# Altium PCB PCB1.PcbDoc (part 3 of 4)
Units mm, origin at the board's own origin, x right, y up, seen from the top; angles counter-clockwise.
Board outline 159.38 x 83.25 mm, 8 copper layers (Top Layer 1, GND, Signal 1, Signal 2, Power, Signal 3, Signal 4, Bottom Layer), stack 1.998 mm thick; 345 components, 291 nets, 1244 pads, 614 vias.
Unrouted connection lines stored in the file: 12.
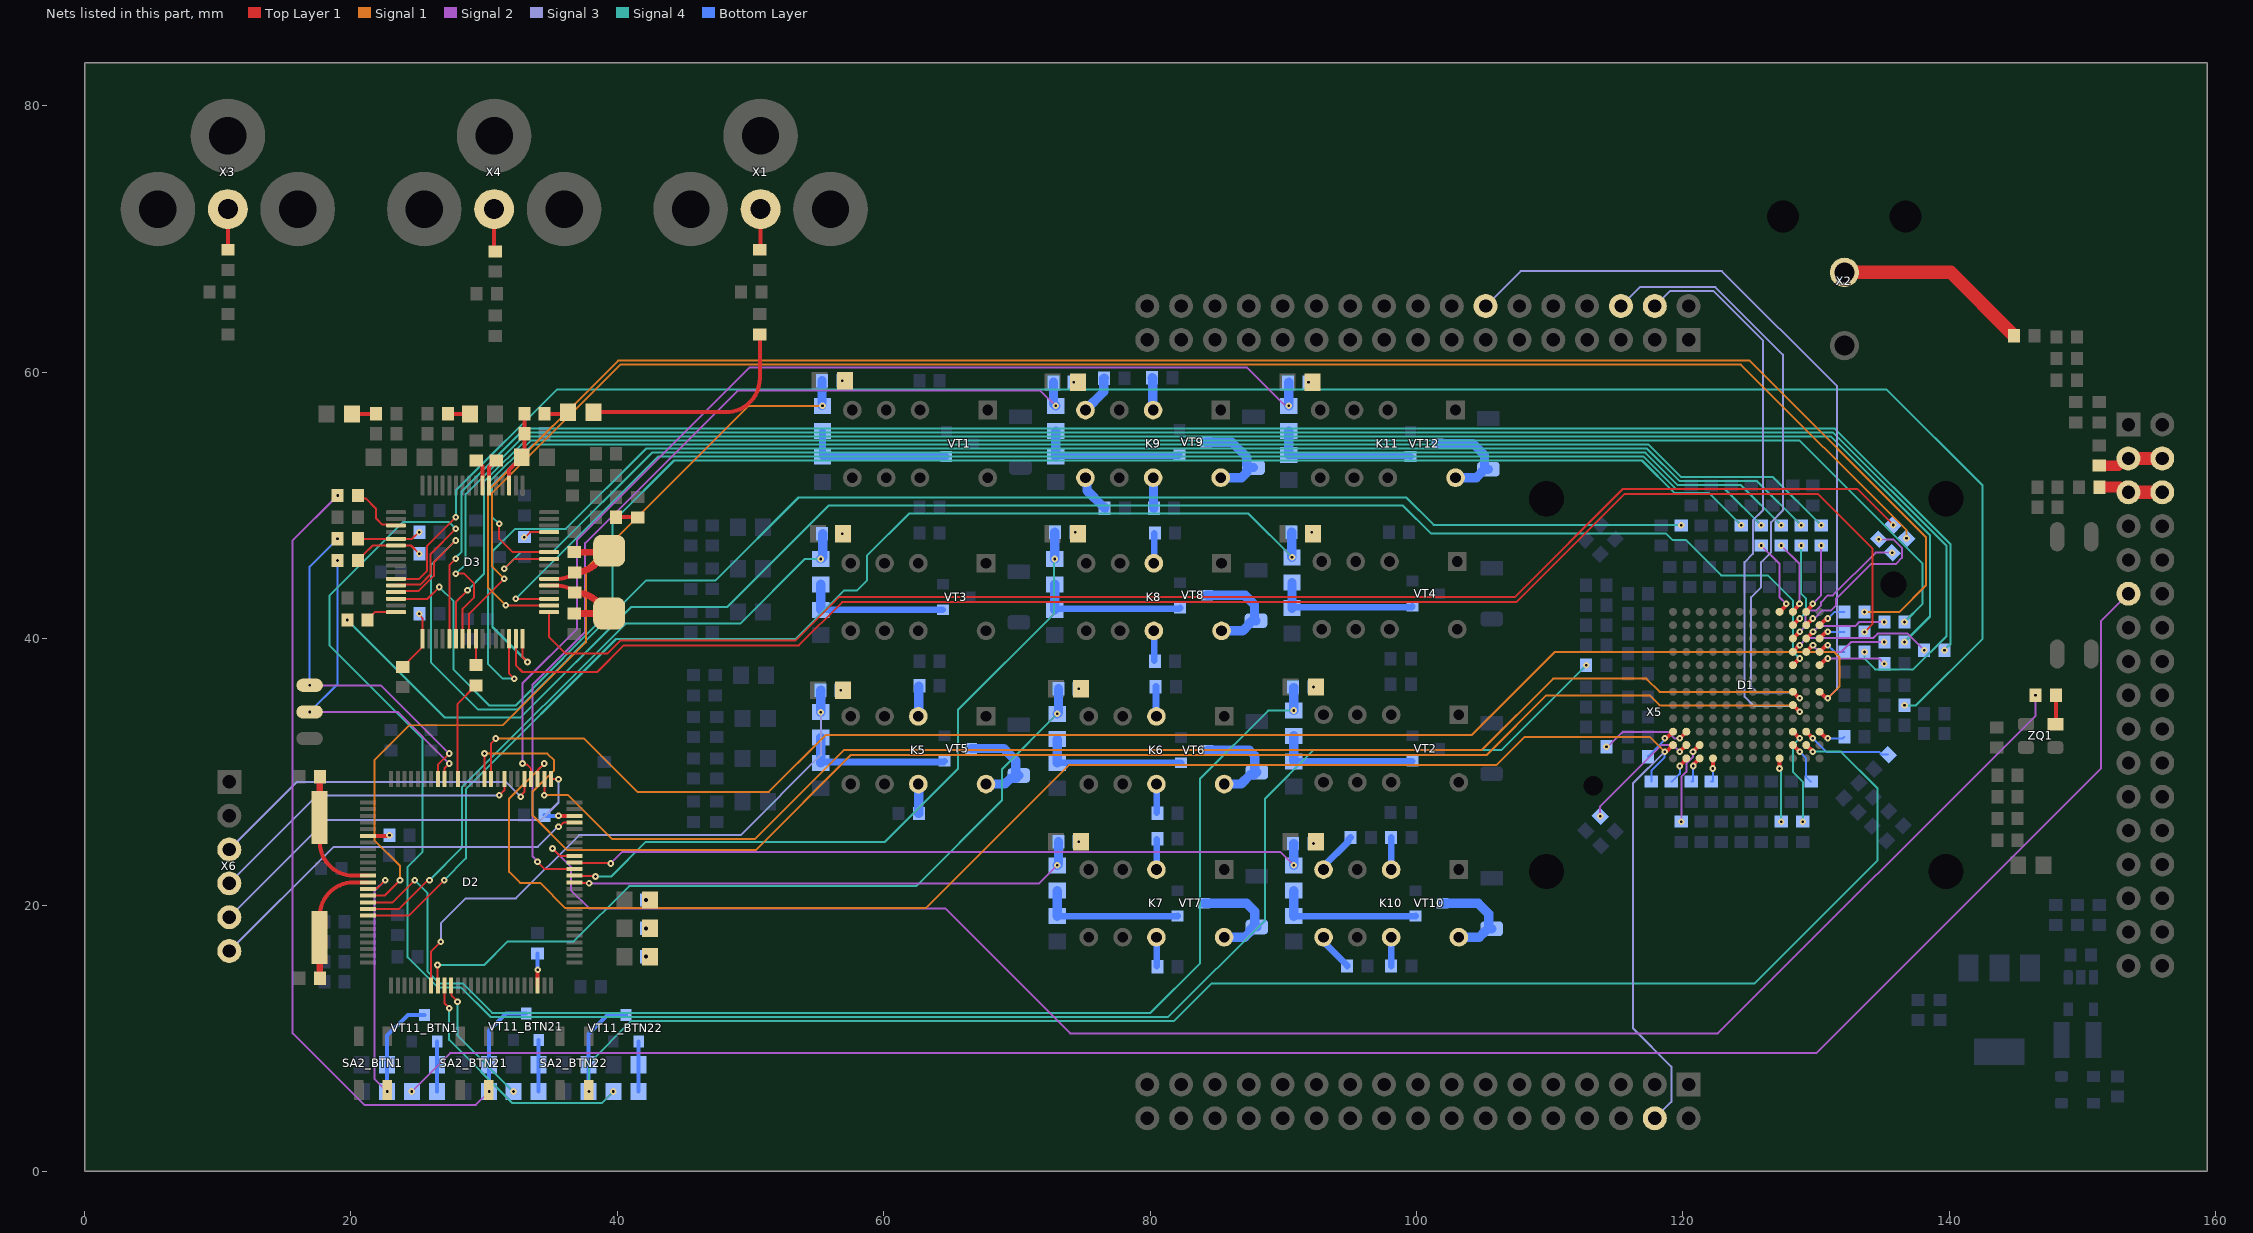
[diagram p9: the nets of this part, all layers, seen from the top]

## Via types
v1: diameter 0.5, hole 0.2, Top Layer 1 to Bottom Layer, tented both sides, 605 vias
v2: diameter 0.6, hole 0.3, Top Layer 1 to Bottom Layer, tented bottom, 6 vias
v3: diameter 0.6, hole 0.3, Top Layer 1 to Bottom Layer, tented both sides, 3 vias

## Nets (pads, with @x,y where several pads share a name; then routed paths per layer and width w, separated by ;. In a path a pad name is that pad's centre, name@x,y a point inside that pad or via, vN(x,y) a via of type N, cw(c..) or ccw(c..) an arc to the next point about the centre after c; other vN are vias at no path point) (continued)
NetK5_3: K5.3 R106.1 | length 2.3
  Top Layer 1 w0.7: K5.3@62.595,34.165 K5.3@62.63,34.2
  Bottom Layer w0.7: K5.3@62.63,34.2 R106.1@62.63,36.428
NetK5_10: K5.10 R113.1 | length 2.2
  Top Layer 1 w0.7: K5.10@62.595,29.085 K5.10@62.63,29.05
  Bottom Layer w0.7: R113.1@62.63,26.873 K5.10@62.63,29.05
NetK5_12: K5.12 VD19.1 VT5.3 | length 7.7
  Bottom Layer w0.7: VT5.3@66.566,31.752 68.998,31.752 69.92,30.83 69.92,29.925 70.12,29.725 VD19.1@70.138,29.725 69.938,29.525 69.525,29.525 69.085,29.085 K5.12@67.675,29.085
NetK6_3: K6.3 R108.1 | length 2.3
  Top Layer 1 w0.5: K6.3@80.443,34.192 K6.3@80.47,34.165
  Bottom Layer w0.5: R108.1@80.417,36.395 R108.1@80.443,36.422 ; K6.3@80.443,34.192 R108.1@80.443,36.369
NetK6_10: K6.10 R114.1 | length 2.2
  Top Layer 1 w0.5: K6.10@80.47,29.085 K6.10@80.506,29.049
  Bottom Layer w0.5: R114.1@80.506,26.931 K6.10@80.506,29.049
NetK6_12: K6.12 VD20.1 VT6.3 | length 7.8
  Bottom Layer w0.7: VT6.3@84.314,31.625 87.445,31.625 87.855,31.215 87.855,30.137 VD20.1@88.013,29.979 87.813,29.779 87.513,29.779 86.819,29.085 K6.12@85.55,29.085
NetK7_3: K7.3 R127.1 | length 2.3
  Top Layer 1 w0.5: K7.3@80.47,22.665 K7.3@80.507,22.702
  Bottom Layer w0.5: K7.3@80.507,22.702 R127.1@80.507,24.947
NetK7_10: K7.10 R134.1 | length 2.2
  Top Layer 1 w0.5: K7.10@80.47,17.585 K7.10@80.507,17.548
  Bottom Layer w0.5: R134.1@80.507,15.396 K7.10@80.507,17.548
NetK7_12: K7.12 VD28.1 VT7.3 | length 8.2
  Bottom Layer w0.7: VT7.3@84.06,20.125 87.25,20.125 87.856,19.519 87.856,18.509 VD28.1@88.013,18.352 87.713,18.352 87.513,18.152 87.513,17.995 87.103,17.585 K7.12@85.55,17.585
NetK8_3: K8.3 R128.1 | length 2.2
  Top Layer 1 w0.5: K8.3@80.279,45.663 K8.3@80.317,45.701
  Bottom Layer w0.5: K8.3@80.317,45.701 R128.1@80.317,47.895
NetK8_10: K8.10 R133.1 | length 2.3
  Top Layer 1 w0.5: K8.10@80.279,40.583 K8.10@80.317,40.545
  Bottom Layer w0.5: R133.1@80.317,38.346 K8.10@80.317,40.545
NetK8_12: K8.12 VD29.1 VT8.3 | length 8.1
  Bottom Layer w0.7: VT8.3@84.25,43.25 87.125,43.25 87.835,42.54 87.835,41.464 VD29.1@87.949,41.35 87.649,41.35 87.449,41.15 87.449,41.074 86.958,40.583 K8.12@85.359,40.583
NetK9_3: K9.3 R129.1 | length 2.4
  Bottom Layer w0.7: R129.1@80.145,59.578 80.182,59.541 80.182,57.203 K9.3@80.22,57.165
NetK9_5: K9.5 R132.1 | length 3
  Bottom Layer w0.7: K9.5@75.14,57.165 76.521,58.546 76.521,59.527 R132.1@76.548,59.554
NetK9_8: K9.8 R137.1 | length 2.9
  Bottom Layer w0.7: K9.8@75.14,52.085 75.259,51.966 75.259,51.129 76.439,49.949 76.489,49.949 76.589,49.849 R137.1@76.589,49.799
NetK9_10: K9.10 R135.1 | length 2.3
  Bottom Layer w0.7: K9.10@80.22,52.085 80.246,52.059 80.246,49.825 R135.1@80.272,49.799
NetK9_12: K9.12 VD30.1 VT9.3 | length 7.6
  Bottom Layer w0.7: VT9.3@84.191,54.752 86.123,54.752 87.263,53.612 87.263,53.052 VD30.1@87.463,52.852 ; K9.12@85.3,52.085 86.853,52.085 87.263,52.495 87.263,52.652 VD30.1@87.463,52.852 ; VD30.1@87.463,52.852 VD30.1@87.763,52.852 VD30.1@87.463,52.852
NetK10_3: K10.3 R130.1 | length 2.4
  Bottom Layer w0.5: K10.3@98.095,22.665 R130.1@98.095,25.072
NetK10_5: K10.5 R131.1 | length 3.2
  Bottom Layer w0.5: K10.5@93.015,22.665 93.015,22.909 94.847,24.741 94.847,24.872 R131.1@95.047,25.072
NetK10_8: K10.8 R138.1 | length 2.9
  Bottom Layer w0.5: K10.8@93.015,17.585 93.187,17.413 93.187,17.076 94.793,15.47 R138.1@94.793,15.42
NetK10_10: K10.10 R136.1 | length 2.2
  Bottom Layer w0.5: R136.1@98.095,15.42 K10.10@98.095,17.585
NetK10_12: K10.12 VD31.1 VT10.3 | length 7.7
  Bottom Layer w0.7: VT10.3@101.939,20.125 104.625,20.125 105.42,19.33 105.42,18.425 VD31.1@105.62,18.225 ; K10.12@103.175,17.585 104.71,17.585 105.138,18.013 105.138,18.025 105.338,18.225 VD31.1@105.638,18.225
NetK11_12: K11.12 VD21.1 VT12.3 | length 7.8
  Bottom Layer w0.7: VT12.3@101.562,54.625 104.25,54.625 105.107,53.768 105.107,52.925 VD21.1@105.307,52.725 ; K11.12@102.925,52.085 104.478,52.085 104.888,52.495 104.888,52.525 105.088,52.725 VD21.1@105.388,52.725
NetR49_1: R49.1 X1.1 | length 3.1
  Top Layer 1 w0.3: R49.1@50.694,69.2 50.75,69.256 X1.1@50.75,72.25
NetR51_1: R51.1 X3.1 | length 3.1
  Top Layer 1 w0.3: X3.1@10.75,72.25 10.75,69.21 R51.1@10.76,69.2
NetR53_1: R53.1 X4.1 | length 3.2
  Top Layer 1 w0.3: X4.1@30.75,72.25 30.75,69.149 R53.1@30.826,69.073
NetR56_2: R56.2 R57.1 | length 1.6
  Top Layer 1 w0.3: R56.2@39.905,49.125 41.495,49.125 cw(c41.495,49.091) R57.1@41.519,49.115
NetR91_2: R91.2 R92.1 | length 1.8
  Top Layer 1 w0.3: R92.1@34.53,56.875 36.175,56.875 R91.2@36.3,57
NetR95_2: R95.2 R96.1 | length 1.6
  Top Layer 1 w0.3: R96.1@27.28,56.875 R95.2@28.925,56.875
NetR99_2: R99.2 R100.1 | length 1.8
  Top Layer 1 w0.3: R99.2@20.075,56.875 R100.1@21.885,56.875
NetR115_1: R115.1 R121.2 VT1.1 | length 11.2
  Bottom Layer w0.5: R115.1@55.404,55.58 R121.2@55.404,53.67 55.406,53.673 64.688,53.673 VT1.1@64.691,53.675
NetR116_1: R116.1 R122.2 VT2.1 | length 10.8
  Bottom Layer w0.5: R122.2@90.779,30.795 90.781,30.798 99.682,30.798 VT2.1@99.685,30.8
  Bottom Layer w0.7: R122.2@90.779,30.795 R116.1@90.779,32.705
NetR117_1: R117.1 R123.2 VT3.1 | length 11.1
  Bottom Layer w0.5: R123.2@55.279,42.17 55.281,42.173 64.436,42.173 VT3.1@64.439,42.175
  Bottom Layer w0.7: R123.2@55.279,42.17 R117.1@55.279,44.08
NetR118_1: R118.1 R124.2 VT4.1 | length 11
  Bottom Layer w0.5: R124.2@90.654,42.295 90.72,42.361 99.621,42.361 VT4.1@99.687,42.427
  Bottom Layer w0.7: R124.2@90.654,42.295 R118.1@90.654,44.205
NetR119_1: R119.1 R125.2 VT5.1 | length 11.3
  Bottom Layer w0.5: R125.2@55.279,30.67 55.345,30.736 64.5,30.736 VT5.1@64.566,30.802
  Bottom Layer w0.7: R125.2@55.279,30.67 R119.1@55.279,32.58
NetR120_1: R120.1 R126.2 VT6.1 | length 11.1
  Bottom Layer w0.5: R126.2@73.027,30.67 73.03,30.673 82.311,30.673 VT6.1@82.314,30.675
  Bottom Layer w0.7: R126.2@73.027,30.67 R120.1@73.027,32.453
NetR139_1: R139.1 R143.2 VT7.1 | length 10.9
  Bottom Layer w0.5: R143.2@73.027,19.17 73.03,19.173 82.057,19.173 VT7.1@82.06,19.175
  Bottom Layer w0.7: R143.2@73.027,19.17 R139.1@73.027,21.08
NetR140_1: R140.1 R144.2 VT8.1 | length 11.4
  Bottom Layer w0.5: R144.2@72.836,42.168 72.902,42.234 82.184,42.234 VT8.1@82.25,42.3
  Bottom Layer w0.7: R144.2@72.836,42.168 R140.1@72.836,44.078
NetR141_1: R141.1 R145.2 VT9.1 | length 11.3
  Bottom Layer w0.5: R145.2@72.904,53.67 72.97,53.736 82.125,53.736 VT9.1@82.191,53.802
  Bottom Layer w0.7: R145.2@72.904,53.67 R141.1@72.904,55.58
NetR142_1: R142.1 R146.2 VT10.1 | length 11.1
  Bottom Layer w0.5: R146.2@90.779,19.17 90.781,19.173 99.936,19.173 VT10.1@99.939,19.175
  Bottom Layer w0.7: R146.2@90.779,19.17 R142.1@90.779,21.08
NetR148_BTN1_1: R148_BTN1.1 R149_BTN1.2 VT11_BTN1.1 | length 3.8
  Bottom Layer w0.3: R148_BTN1.1@26.47,6 VT11_BTN1.1@26.47,9.75
NetR148_BTN21_1: R148_BTN21.1 R149_BTN21.2 VT11_BTN21.1 | length 3.9
  Bottom Layer w0.3: R148_BTN21.1@34.095,6 R149_BTN21.2@34.095,8 VT11_BTN21.1@34.095,9.875
NetR148_BTN22_1: R148_BTN22.1 R149_BTN22.2 VT11_BTN22.1 | length 3.8
  Bottom Layer w0.3: R148_BTN22.1@41.595,6 R149_BTN22.2@41.595,8 VT11_BTN22.1@41.595,9.75
NetR150_1: R150.1 R151.2 VT12.1 | length 11
  Bottom Layer w0.5: R151.2@90.402,53.797 90.463,53.736 99.501,53.736 VT12.1@99.562,53.675
  Bottom Layer w0.7: R151.2@90.402,53.797 R150.1@90.402,55.58
NetR155_2: R155.2 VD1.1
  other v1: 56.885,59.375
NetR156_2: R156.2 VD2.1
  other v1: 92.26,36.375
NetR157_2: R157.2 VD3.1
  other v1: 56.885,47.875
NetR158_2: R158.2 VD4.1
  other v1: 92.135,48
NetR159_2: R159.2 VD6.1
  other v1: 56.76,36.125
NetR160_2: R160.2 VD8.1
  other v1: 74.635,36.25
NetR161_2: R161.2 VD10.1
  other v1: 74.635,24.75
NetR162_2: R162.2 VD11.1
  other v1: 74.385,48
NetR163_2: R163.2 VD12.1
  other v1: 74.26,59.25
NetR164_2: R164.2 VD13.1
  other v1: 92.26,24.625
NetR165_2: R165.2 VD14.1
  other v1: 91.885,59.25
NetR166_2: R166.2 VD5.1
  other v3: 42.135,20.375
NetR167_2: R167.2 VD7.1
  other v3: 42.135,18.25
NetR168_2: R168.2 VD9.1
  other v3: 42.135,16.125
nINTRQ_5: D3.1 R153.1 R154.2 | length 4.7
  Top Layer 1 w0.15: R154.2@23.875,37.885 25.378,39.388 D3.1@25.378,39.994 25.378,41.541 25.125,41.794 v1(25.125,41.875)
nIRQ: D1.G10 D2.77 X5.19 | length 147.9
  Top Layer 1 w0.15: v1(34.5,28.25) 34.518,28.25 D2.77@34.518,29.452
  Top Layer 1 w0.3: D1.G10@128.256,36.014 128.261,36.014 128.757,35.518 v1(128.761,35.518)
  Signal 1 w0.15: v1(34.5,28.25) 36.304,28.25 39.59,24.965 50.34,24.965 57,31.625 104.875,31.625 110.25,37 117.25,37 118.25,36 128.28,36 v1(128.761,35.518)
  Signal 3 w0.15: X5.19@115.346,64.972 116.771,66.397 122.432,66.397 127.5,61.329 127.5,49.625 126.625,48.75 126.625,46.5 125.875,45.75 125.875,43.875 125.125,43.125 125.125,36.375 125.557,35.943 128.336,35.943 v1(128.761,35.518)
nPDN_5: D3.29 R64.1 | length 2
  Top Layer 1 w0.15: v1(33,47.625) 33.081,47.625 33.45,47.994 D3.29@34.878,47.994
nRD: D1.G12 D2.85 X5.23 | length 169.3
  Top Layer 1 w0.15: D2.85@30.518,29.452 30.518,32.143 v1(30.875,32.5)
  Top Layer 1 w0.3: D1.G12@130.275,35.995 130.695,35.575 130.818,35.575 v1(130.875,35.518)
  Signal 1 w0.15: v1(30.875,32.5) 37.5,32.5 41.5,28.5 51.375,28.5 55.625,32.75 104.125,32.75 110.375,39 131.375,39 131.75,38.625 131.75,36.393 v1(130.875,35.518)
  Signal 3 w0.15: X5.23@105.186,64.972 107.811,67.597 122.929,67.597 131.55,58.976 131.55,36.193 v1(130.875,35.518)
nRESET: C75_BTN22.2 D1.L11 R147_BTN22.2 SA2_BTN22.4 VT11_BTN22.3 | length 125
  Top Layer 1 w0.3: D1.L11@129.256,32.014 v1(129.757,31.512)
  Signal 4 w0.15: v1(37.875,6) 37.875,8.125 41.05,11.3 81.8,11.3 84.625,14.125 125.375,14.125 134.625,23.375 134.625,28.75 131.863,31.512 v1(129.757,31.512)
  Bottom Layer w0.3: R147_BTN22.2@37.845,6 C75_BTN22.2@37.845,8 37.845,10.325 39.27,11.75 VT11_BTN22.3@40.645,11.75
nRESET_STM: C75_BTN1.2 D2.14 R147_BTN1.2 SA2_BTN1.4 VT11_BTN1.3 | length 25.8
  Top Layer 1 w0.15: D2.14@21.268,21.202 21.337,21.271 21.967,21.271 v1(22.57,21.875)
  Signal 2 w0.15: v1(22.57,21.875) 21.75,21.055 21.75,6.97 v1(22.72,6)
  Bottom Layer w0.3: v1(22.72,6) 22.72,8.125 22.72,10.2 24.27,11.75 VT11_BTN1.3@25.52,11.75
nRS_ADV212: D2.34 R148_BTN22.2 | length 18.9
  Top Layer 1 w0.15: D2.34@27.018,13.952 27.018,12.635 27.375,12.278 v1(27.375,12.25)
  Signal 4 w0.15: v1(27.375,12.25) 27.375,9.875 32.125,5.125 38.82,5.125 v1(39.695,6)
nRS_ADV718: D2.35 R148_BTN21.2 | length 9.9
  Top Layer 1 w0.15: D2.35@27.518,13.952 27.535,13.935 27.535,13.215 v1(28,12.75)
  Signal 4 w0.15: v1(28,12.75) 28,10.195 v1(32.195,6)
nRST_5: D3.51 R59.1 | length 4.2
  Top Layer 1 w0.15: R59.1@20.51,50.75 20.732,50.528 21.097,50.528 21.875,49.75 21.875,49.028 22.334,48.569 23.303,48.569 D3.51@23.378,48.494
nRST_ADV7180_1: C75_BTN21.2 R59.2 R147_BTN21.2 SA2_BTN21.4 VT11_BTN21.3 | length 67.1
  Signal 2 w0.15: v1(19,50.75) 15.625,47.375 15.625,10.375 21,5 29.375,5 v1(30.375,6)
  Bottom Layer w0.3: R147_BTN21.2@30.345,6 C75_BTN21.2@30.345,8 30.345,10.575 31.645,11.875 VT11_BTN21.3@33.145,11.875
nWE: D1.H10 D2.86 X5.18 | length 156.5
  Top Layer 1 w0.15: D2.86@30.018,29.452 v1(30.018,31.375)
  Top Layer 1 w0.3: D1.H10@128.256,35.014 128.261,35.014 128.757,34.518 v1(128.761,34.518)
  Signal 1 w0.15: v1(30.018,31.375) 34.75,31.375 35.25,30.875 35.25,30.125 33.625,28.5 33.625,26.75 36.25,24.125 39.625,24.125 50.375,24.125 57.5,31.25 105.25,31.25 109.75,35.75 117.5,35.75 118.25,35 128.28,35 v1(128.761,34.518)
  Signal 3 w0.15: X5.18@117.886,64.972 119.011,66.097 122.308,66.097 126,62.405 126,49.625 125.25,48.875 125.25,46.375 124.625,45.75 124.625,35.625 125.307,34.943 128.336,34.943 v1(128.761,34.518)
OSC_IN_3: C31.1 D2.12 ZQ2.1 | length 10
  Top Layer 1 w0.3: ZQ2.1@17.651,26.567 17.651,24.742 ccw(c20.191,24.742) 20.191,22.202 D2.12@21.268,22.202
  Top Layer 1 w0.5: ZQ2.1@17.651,26.567 17.655,26.571 C31.1@17.655,29.625
OSC_OUT_3: C32.1 D2.13 ZQ2.2 | length 9.7
  Top Layer 1 w0.3: ZQ2.2@17.651,17.567 17.651,19.162 cw(c20.191,19.162) 20.191,21.702 D2.13@21.268,21.702
  Top Layer 1 w0.5: ZQ2.2@17.651,17.567 17.655,17.563 C32.1@17.655,14.5
P0_5: D3.26 R60.1 | length 112
  Top Layer 1 w0.15: v1(31.125,48.625) 31.125,47.5 32.131,46.494 D3.26@34.878,46.494
  Signal 4 w0.15: v1(31.125,48.625) 30.581,49.169 30.581,51.532 33.624,54.575 117.425,54.575 119.875,52.125 126.76,52.125 v1(130.375,48.51)
P1_5: D3.25 R65.1 | length 105.4
  Top Layer 1 w0.15: v1(31.5,45.25) 32.247,45.997 34.875,45.997 D3.25@34.878,45.994
  Signal 4 w0.15: v1(31.5,45.25) 32.75,46.5 35.125,46.5 42.6,53.975 117.176,53.975 119.626,51.525 124.36,51.525 v1(127.375,48.51)
P2_5: D3.19 R70.1 | length 102.6
  Top Layer 1 w0.15: v1(32.375,43) 32.378,42.997 34.875,42.997 D3.19@34.878,42.994
  Signal 4 w0.15: v1(32.375,43) 43.05,53.675 117.052,53.675 119.502,51.225 123.16,51.225 v1(125.875,48.51)
P3_5: D3.18 R75.1 | length 139
  Top Layer 1 w0.15: v1(31.625,42.5) 31.628,42.497 34.875,42.497 D3.18@34.878,42.494
  Signal 1 w0.15: v1(31.625,42.5) 30.3,43.825 30.3,51.126 40.049,60.875 125,60.875 138.25,47.625 138.25,44 136.25,42 v1(133.635,42)
P4_5: D3.17 R79.1 | length 109.5
  Top Layer 1 w0.15: D3.17@34.878,41.994 34.878,40.122 36.125,38.875 39.25,38.875 40.25,39.875 53.375,39.875 56.625,43.125 107.375,43.125 115.5,51.25 133.075,51.25 v1(135.787,48.537)
P5_5: D3.16 R82.1 | length 115.1
  Top Layer 1 w0.15: D3.16@32.878,39.994 32.878,38.622 v1(33.25,38.25)
  Signal 4 w0.15: v1(33.25,38.25) 30.625,40.875 30.625,46.554 32.321,48.25 36.125,48.25 42.15,54.275 117.301,54.275 119.751,51.825 125.56,51.825 v1(128.875,48.51)
P6_5: D3.15 R85.1 | length 117.8
  Top Layer 1 w0.15: D3.15@32.378,39.994 32.378,37.997 32.875,37.5 38.479,37.5 40.479,39.5 53.625,39.5 56.875,42.75 107.5,42.75 115.625,50.875 130.125,50.875 134.25,46.75 134.25,41.115 v1(133.635,40.5)
P7_5: D3.14 R88.1 | length 137
  Top Layer 1 w0.15: D3.14@31.878,39.994 31.878,37.372 v1(32.25,37)
  Signal 4 w0.15: v1(32.25,37) 31.388,37 30.281,38.108 30.281,51.656 33.5,54.875 128.763,54.875 138,45.638 138,42.615 v1(136.635,41.25)
P8_5: D3.8 R61.1 | length 128.3
  Top Layer 1 w0.15: D3.8@28.878,39.994 28.878,41.878 v1(31.5,44.5)
  Signal 1 w0.15: v1(31.5,44.5) 30.6,45.4 30.6,50.954 40.221,60.575 124.351,60.575 136.787,48.138 v1(136.787,47.537)
P9_5: D3.7 R66.1 | length 143.9
  Top Layer 1 w0.15: v1(27.875,44.875) 28.5,44.875 29.25,44.125 29.25,43.125 28.378,42.253 D3.7@28.378,39.994
  Signal 4 w0.15: v1(27.875,44.875) 28.6,45.6 28.6,50.85 33.225,55.475 131.275,55.475 139.788,46.962 139.788,40.197 137.291,37.7 134.425,37.7 133.635,38.49 v1(133.635,39)
P10_5: D3.6 R71.1 | length 134.5
  Top Layer 1 w0.15: D3.6@27.878,39.994 27.877,39.995 27.877,42.751 v1(28.75,43.625)
  Signal 4 w0.15: v1(28.75,43.625) 29.981,44.856 29.981,51.78 33.376,55.175 131.124,55.175 138.55,47.749 138.55,41.665 v1(136.635,39.75)
P11_5: D3.5 R76.1 | length 136.9
  Top Layer 1 w0.15: D3.5@27.378,39.994 27.378,45.503 v1(27.875,46)
  Signal 4 w0.15: v1(27.875,46) 27.875,46.095 28.3,46.52 28.3,51.05 33.025,55.775 131.399,55.775 140.088,47.086 140.088,39.578 v1(139.635,39.125)
P12_5: D3.62 R80.1 | length 121.5
  Top Layer 1 w0.15: D3.62@23.378,42.994 25.744,42.994 v1(26.625,43.875)
  Signal 4 w0.15: v1(26.625,43.875) 27.7,42.8 27.7,37.675 30.4,34.975 32.35,34.975 39.625,42.25 39.625,48.75 44.25,53.375 116.928,53.375 119.378,50.925 121.96,50.925 v1(124.375,48.51)
P13_5: D3.61 R83.1 | length 119.4
  Top Layer 1 w0.15: D3.61@23.382,43.498 23.445,43.561 25.061,43.561 26.22,44.72 26.22,45.72 v1(27.875,47.375)
  Signal 4 w0.15: v1(27.875,47.375) 26,45.5 26,38.234 29.559,34.675 32.474,34.675 39.925,42.126 42.174,44.375 47.375,44.375 53.6,50.6 99.227,50.6 101.277,48.55 119.835,48.55 v1(119.875,48.51)
P14_5: D3.60 R86.1 | length 156.3
  Top Layer 1 w0.15: D3.60@23.378,43.994 23.445,44.061 25.186,44.061 25.97,44.845 25.97,46.345 v1(27.875,48.25)
  Signal 4 w0.15: v1(27.875,48.25) 27.375,48.75 23.899,48.75 18.375,43.226 18.375,39.5 25.375,32.5 25.375,24 24.25,22.875 24.25,16.076 26.501,13.825 28.251,13.825 30.476,11.6 81.35,11.6 88.625,18.875 88.625,28 92.25,31.625 106.365,31.625 v1(112.74,38)
P15_5: D3.59 R89.1 | length 149.7
  Top Layer 1 w0.15: D3.59@23.378,44.494 23.382,44.498 25.123,44.498 25.72,45.095 25.72,46.97 v1(27.875,49.125)
  Signal 4 w0.15: v1(27.875,49.125) 27.875,51.125 35.45,58.7 135.3,58.7 142.5,51.5 142.5,40 137.5,35 v1(136.635,35)
RELE1: D2.15 R115.2 R155.1 | length 62.5
  Top Layer 1 w0.15: D2.15@21.268,20.702 22.517,20.702 v1(23.678,21.863) v1@23.732,21.917
  Signal 1 w0.15: v1(23.678,21.863) 23.678,22.947 21.75,24.875 21.75,30.875 24.375,33.5 31.398,33.5 37.627,39.729 37.627,45.252 49.855,57.48 v1(55.404,57.48)
  Bottom Layer w0.7: R115.2@55.365,57.519 R155.1@55.365,59.375
RELE2: D2.16 R116.2 R156.1 | length 97.2
  Top Layer 1 w0.15: D2.16@21.268,20.202 23.124,20.202 v1(24.785,21.863) v1@24.871,21.949
  Signal 4 w0.15: v1(24.785,21.863) 25.75,20.898 25.75,15 26.625,14.125 28.375,14.125 30.6,11.9 80.025,11.9 83.75,15.625 83.75,29.5 88.855,34.605 v1(90.779,34.605)
  Bottom Layer w0.7: v1(90.779,34.605) R156.1@90.779,36.336
RELE3: D2.17 R117.2 R157.1 | length 49.4
  Top Layer 1 w0.15: D2.17@21.268,19.702 23.577,19.702 v1@25.75,21.875
  Signal 4 w0.15: v1(25.893,21.875) 28.325,24.307 28.325,28.829 40.621,41.125 49.211,41.125 54.066,45.98 v1(55.279,45.98)
  Bottom Layer w0.7: v1(55.279,45.98) 55.408,46.109 R157.1@55.408,47.875
RELE4: D2.18 R118.2 R158.1 | length 89.3
  Top Layer 1 w0.15: D2.18@21.268,19.202 24.327,19.202 v1(27,21.875)
  Signal 4 w0.15: v1(27,21.875) 28.625,23.5 28.625,28.704 39.896,39.975 53.376,39.975 57.001,43.6 57.975,43.6 58.75,44.375 58.75,46.25 61.9,49.4 87.361,49.4 v1(90.655,46.106)
  Bottom Layer w0.7: R158.1@90.615,48 90.634,47.981 90.634,46.127 v1(90.655,46.106) v1(90.655,46.106)
RELE5: D2.32 R119.2 R159.1 | length 43.6
  Top Layer 1 w0.15: D2.32@26.018,13.952 26.018,16.518 v1(26.75,17.25)
  Signal 3 w0.15: v1(26.75,17.25) 26.75,18.625 28.625,20.5 32.375,20.5 37.125,25.25 49.25,25.25 55.279,31.279 v1(55.279,34.48)
  Bottom Layer w0.7: v1(55.279,34.48) 55.28,34.481 55.28,36.124 R159.1@55.281,36.125
RELE6: D2.33 R120.2 R160.1 | length 59.2
  Top Layer 1 w0.15: v1(26.5,15.5) 26.509,15.491 26.509,13.961 D2.33@26.518,13.952
  Signal 4 w0.15: v1(26.5,15.5) 30,15.5 31.775,17.275 36.726,17.275 40.876,21.425 62.425,21.425 68.875,27.875 68.875,30.201 v1(73.028,34.354)
  Bottom Layer w0.5: R120.2@73.027,34.353 v1(73.028,34.354)
  Bottom Layer w0.7: v1(73.028,34.354) 73.115,34.441 R160.1@73.115,36.25
RELE7: D2.63 R139.2 R161.1 | length 38.7
  Top Layer 1 w0.15: D2.63@36.768,21.702 36.806,21.663 37.837,21.663 v1(37.875,21.625)
  Signal 2 w0.15: v1(37.875,21.625) 71.672,21.625 v1(73.028,22.981)
  Bottom Layer w0.5: R139.2@73.027,22.98 v1(73.028,22.981)
  Bottom Layer w0.7: v1(73.028,22.981) 73.115,23.068 R161.1@73.115,24.75
RELE8: D2.64 R140.2 R162.1 | length 53
  Top Layer 1 w0.15: D2.64@36.768,22.202 36.797,22.173 38.327,22.173 v1(38.356,22.144)
  Signal 4 w0.15: v1(38.356,22.144) 39.524,22.144 42.105,24.725 60.056,24.725 65.575,30.244 65.575,34.673 72.786,41.884 72.786,45.928 v1(72.836,45.978)
  Bottom Layer w0.7: v1(72.836,45.978) v1(72.836,45.978) 72.837,47.999 R162.1@72.838,48
RELE9: D2.65 R141.2 R163.1 | length 71.1
  Top Layer 1 w0.15: v1(34,23.25) 34.524,22.726 36.744,22.726 D2.65@36.768,22.702
  Signal 2 w0.15: v1(34,23.25) 34,23.278 33.625,23.653 33.625,36.549 37.575,40.499 37.575,47.167 49.033,58.625 71.759,58.625 v1(72.904,57.48)
  Bottom Layer w0.7: R163.1@72.74,59.25 72.74,57.644 v1(72.904,57.48)
RELE10: D2.66 R142.2 R164.1 | length 56.5
  Top Layer 1 w0.15: D2.66@36.768,23.202 36.806,23.163 39.462,23.163 v1(39.5,23.125)
  Signal 2 w0.15: v1(39.5,23.125) 40.375,24 89.761,24 v1(90.78,22.981)
  Bottom Layer w0.7: R142.2@90.779,22.98 v1(90.78,22.981) R164.1@90.78,24.625
RELE11: D2.79 R150.2 R165.1 | length 81.9
  Top Layer 1 w0.15: v1(32.875,30.625) 32.936,30.564 33.186,30.564 33.528,30.222 33.528,29.517 D2.79@33.593,29.452
  Signal 2 w0.15: v1(32.875,30.625) 32.875,36.648 36.975,40.748 36.975,47.416 49.934,60.375 87.25,60.375 90.059,57.566 90.316,57.566 v1(90.402,57.48)
  Bottom Layer w0.7: R165.1@90.404,59.25 90.403,59.249 R150.2@90.403,57.481 ; v1(90.402,57.48) R150.2@90.403,57.481
RST_F_1: R148_BTN1.2 X5.OUT1 | length 150.8
  Signal 2 w0.15: v1(24.57,6) 27.445,8.875 130,8.875 151.375,30.25 151.375,41.301 X5.OUT1@153.446,43.372
RX5_3: D2.83 X6.4 | length 24.4
  Top Layer 1 w0.15: v1(31.141,28.237) 31.518,28.614 D2.83@31.518,29.452
  Signal 3 w0.15: X6.4@10.865,21.63 17.472,28.237 v1(31.141,28.237)
SCLK_1: D2.92 KP2.1 R62.2 | length 25.6
  Top Layer 1 w0.15: D2.92@27.018,29.452 27.018,30.268 v1(27.375,30.625)
  Signal 2 w0.15: v1(16.895,34.5) 23.5,34.5 v1(27.375,30.625)
  Bottom Layer w0.15: v1(16.895,34.5) 18.99,36.595 v1(18.99,45.875)
SCLK_5: D3.54 R46.1 R62.1 | length 5.8
  Top Layer 1 w0.15: R62.1@20.473,45.8 R62.1@20.885,45.8 ; R62.1@20.51,45.875 20.51,45.925 20.885,46.3 20.935,46.3 21.629,46.994 D3.54@23.378,46.994 24.506,46.994 v1(25.125,46.375)
SCOMM0_2: D1.K2 R1.2 | length 6.9
  Top Layer 1 w0.3: v1(119.761,32.514) 119.761,32.516 120.256,33.012 D1.K2@120.256,33.014
  Signal 2 w0.15: v1(114.26,31.875) 114.355,31.875 115.48,33 118.875,33 119.375,32.5 119.747,32.5 v1(119.761,32.514)
SCOMM1_2: D1.K1 R6.2 | length 2.7
  Top Layer 1 w0.3: v1(118.625,32.514) 118.682,32.571 118.813,32.571 D1.K1@119.237,32.995
  Bottom Layer w0.15: R6.2@117.385,31.125 117.385,31.175 118.558,32.348 118.558,32.447 v1(118.625,32.514)
SCOMM2_2: D1.L3 R7.2 | length 6.3
  Top Layer 1 w0.3: v1(120.76,31.512) 120.76,31.515 121.256,32.011 D1.L3@121.256,32.014
  Signal 2 w0.15: v1(119.875,26.26) 119.875,29.625 120.25,30 120.25,30.625 120.76,31.135 v1(120.76,31.512)
SCOMM3_2: D1.L2 R10.2 | length 9.5
  Top Layer 1 w0.3: v1(119.761,31.512) 119.761,31.515 120.256,32.011 D1.L2@120.256,32.014
  Signal 2 w0.15: v1(113.787,26.662) 113.787,27.412 118.387,32.012 119.261,32.012 v1(119.761,31.512)
SCOMM4: D1.L1 D2.78 R13.2 X5.48 | length 138
  Top Layer 1 w0.15: D2.78@34.018,29.452 34.057,29.491 34.057,30.182 v1(34.5,30.625)
  Top Layer 1 w0.3: v1(118.625,31.512) 118.682,31.569 118.811,31.569 D1.L1@119.256,32.014
  Signal 1 w0.15: v1(34.5,30.625) 31.875,28 31.875,22.5 32.7,21.675 34.2,21.675 36.1,19.775 63.15,19.775 73.875,30.5 106,30.5 108.125,32.625 117.512,32.625 v1(118.625,31.512)
  Signal 3 w0.15: X5.48@117.886,3.992 119.125,5.231 119.125,7.875 116.25,10.75 116.25,29.137 v1(118.625,31.512)
  Bottom Layer w0.15: R13.2@117.625,29.26 117.625,30.097 117.928,30.4 118.619,31.091 118.619,31.506 v1(118.625,31.512)
SCOMM5_2: D1.M4 R16.2 | length 1.9
  Top Layer 1 w0.3: D1.M4@122.237,30.995 122.253,30.979 122.253,30.253 v1(122.25,30.25)
  Bottom Layer w0.15: R16.2@122.125,29.26 122.25,29.26 v1(122.25,30.25)
SCOMM6_2: D1.M3 R19.2 | length 2.1
  Top Layer 1 w0.3: v1(120.766,30.442) 120.824,30.499 120.824,30.582 D1.M3@121.237,30.995
  Bottom Layer w0.15: R19.2@120.625,29.26 120.766,29.26 v1(120.766,30.442)
SCOMM7_2: D1.M2 R22.2 | length 2.3
  Top Layer 1 w0.3: v1(119.761,30.442) 120.237,30.918 120.237,30.995 D1.M2@120.256,31.014
  Bottom Layer w0.15: R22.2@119.125,29.26 119.175,29.26 119.761,29.846 v1(119.761,30.442)
SDATA_1: D2.93 KP1.1 R67.2 | length 26.7
  Top Layer 1 w0.15: D2.93@26.518,29.452 26.518,30.518 v1(27.375,31.375)
  Signal 2 w0.15: v1(16.895,36.5) 22.25,36.5 v1(27.375,31.375)
  Bottom Layer w0.15: v1(16.895,36.5) 16.895,45.405 v1(18.99,47.5)
SDATA_5: D3.53 R47.1 R67.1 | length 4.8
  Top Layer 1 w0.15: R67.1@20.516,47.494 24.578,47.494 25.084,48 v1(25.125,48)
SFL_1: D2.90 R72.2 | length 7.7
  Top Layer 1 w0.15: D2.90@28,29.375 28,35.105 R72.2@29.385,36.49
SFL_5: D3.9 R72.1 | length 2
  Top Layer 1 w0.15: D3.9@29.378,39.994 29.378,38.017 R72.1@29.385,38.01
SWC_3: D2.76 X6.5 | length 30.6
  Top Layer 1 w0.15: D2.76@35.018,29.452 v1(35.577,29.452)
  Signal 3 w0.15: X6.5@10.865,19.09 18.15,26.375 34.25,26.375 35.577,27.702 v1(35.577,29.452)
SWD_3: D2.72 X6.6 | length 29.9
  Top Layer 1 w0.15: v1@35.625,25.875 35.936,26.186 36.752,26.186 D2.72@36.768,26.202
  Signal 3 w0.15: X6.6@10.865,16.55 18.69,24.375 34.024,24.375 35.524,25.875 v1(35.577,25.875)
TCK_2: D1.K12 R25.2 | length 2.1
  Top Layer 1 w0.3: D1.K12@130.275,32.995 130.694,32.576 130.818,32.576 v1(130.875,32.518)
  Bottom Layer w0.15: v1(130.875,32.518) 132.008,32.518 R25.2@132.115,32.625
TDI_2: D1.M9 R34.2 | length 4.8
  Top Layer 1 w0.3: v1(127.25,30.25) 127.253,30.253 127.253,31.011 D1.M9@127.256,31.014
  Signal 4 w0.15: v1(127.25,30.25) 127.25,30.155 127.375,30.03 v1(127.375,26.26)
TDO_2: D1.L10 R152.2 | length 3.3
  Top Layer 1 w0.3: D1.L10@128.256,32.014 128.258,32.014 128.76,31.512 v1(128.761,31.512)
  Bottom Layer w0.15: v1(128.761,31.512) 129.227,31.047 129.227,29.635 129.602,29.26 R152.2@129.625,29.26
TMS_2: D1.K10 R31.2 | length 7.5
  Top Layer 1 w0.3: D1.K10@128.256,33.014 128.261,33.014 128.757,32.518 v1(128.761,32.518)
  Signal 4 w0.15: v1(128.761,32.518) 128.25,32.007 128.25,30 129,29.25 v1(129,26.26)
TRI_ZQ: R69.2 ZQ1.1 | length 2.2
  Top Layer 1 w0.3: ZQ1.1@147.954,33.579 147.995,33.579 R69.2@147.995,35.752
TRI_ZQ_3: D2.67 R69.1 | length 131.4
  Top Layer 1 w0.15: v1(35.125,24.25) 35.673,23.702 D2.67@36.768,23.702
  Signal 2 w0.15: v1(35.125,24.25) 36.5,22.875 36.5,21.125 37.875,19.75 64.625,19.75 74,10.375 122.625,10.375 146.475,34.225 v1(146.475,35.752)
TRS_2: D1.K11 R28.2 | length 6.9
  Top Layer 1 w0.3: D1.K11@129.256,33.014 129.259,33.014 129.754,32.518 v1(129.757,32.518)
  Bottom Layer w0.15: v1(129.757,32.518) 130.776,31.5 134.728,31.5 134.94,31.287 R28.2@135.412,31.287
TX5_3: D2.80 X6.3 | length 25.9
  Top Layer 1 w0.15: v1(32.75,28.125) 32.75,28.22 33.018,28.488 D2.80@33.018,29.452
  Signal 3 w0.15: X6.3@10.865,24.17 15.945,29.25 31.625,29.25 v1(32.75,28.125)
VBAT_3: D2.6 R48.1 | length 1.6
  Top Layer 1 w0.3: D2.6@21.268,25.202 22.837,25.202 v1(22.885,25.25)
VCAP1_3: C33.2 D2.48 | length 2.4
  Top Layer 1 w0.3: D2.48@34.018,13.952 v1(34.018,15.143)
  Bottom Layer w0.3: C33.2@34,16.365 34.018,16.347 v1(34.018,15.143)
VCAP2_3: C34.2 D2.73 | length 2.3
  Top Layer 1 w0.3: v1(35.577,26.702) D2.73@36.768,26.702
  Bottom Layer w0.3: C34.2@34.51,26.75 34.558,26.702 v1(35.577,26.702)
VCC_4: R169.1 X5.+5V_VCCF X5.+5V_VCCS | length 5
  Top Layer 1 w0.8: R169.1@151.25,52.99 152.688,52.99 X5.+5V_VCCF@153.23,53.532
  Top Layer 1 w1: X5.+5V_VCCF@153.23,53.532 X5.+5V_VCCS@155.986,53.532
VCC_EXT_1: R172.1 X2.1 | length 14.5
  Top Layer 1 w1: X2.1@132.125,67.5 140.115,67.5 R172.1@144.745,62.87
VCLK_1: D1.E12 R78.2 | length 5.2
  Top Layer 1 w0.3: D1.E12@130.275,38.033 130.696,38.454 130.818,38.454 v1(130.875,38.511)
  Signal 2 w0.15: v1(130.875,38.511) 134.729,38.511 v1(135.115,38.125)
VDATA0_1: D1.A11 R60.2 | length 5.4
  Top Layer 1 w0.3: D1.A11@129.256,42.014 129.256,42.041 129.693,42.478 129.693,42.568 v1@129.75,42.625
  Signal 2 w0.15: v1(129.752,42.625) 130.375,43.248 v1(130.375,46.99)
VDATA1_1: D1.A10 R65.2 | length 5.8
  Top Layer 1 w0.3: D1.A10@128.256,42.014 128.256,42.041 128.693,42.478 128.693,42.568 v1@128.75,42.625
  Signal 2 w0.15: v1(127.375,46.99) 128.757,45.608 v1(128.757,42.625)
VDATA2_1: D1.A9 R70.2 | length 5.9
  Top Layer 1 w0.3: D1.A9@127.275,42.033 127.693,42.451 127.693,42.568 v1(127.751,42.625)
  Signal 2 w0.15: v1(125.875,46.99) 127.25,45.615 127.25,43.126 v1(127.751,42.625)
VDATA3_1: D1.B12 R75.2 | length 2.2
  Top Layer 1 w0.3: D1.B12@130.275,41.033 130.694,41.452 130.818,41.452 v1(130.875,41.51)
  Bottom Layer w0.15: v1(130.875,41.51) 131.365,42 R75.2@132.115,42
VDATA4_1: D1.B11 R79.2 | length 12.3
  Top Layer 1 w0.3: D1.B11@129.256,41.014 v1(129.752,41.51)
  Signal 2 w0.15: v1(129.752,41.51) 129.847,41.51 130.462,42.125 131.125,42.125 131.5,42.5 131.5,43 134.125,45.625 136,45.625 136.438,46.063 136.438,46.812 135.787,47.463 v1(134.713,47.463)
VDATA5_1: D1.B10 R82.2 | length 6.5
  Top Layer 1 w0.3: D1.B10@128.256,41.014 128.259,41.014 128.754,41.51 v1@128.757,41.51
  Signal 4 w0.15: v1(128.759,41.51) 129.25,42 129.25,43 128.875,43.375 v1(128.875,46.99)
VDATA6_1: D1.C12 R85.2 | length 2
  Top Layer 1 w0.3: D1.C12@130.275,40.033 130.696,40.454 130.818,40.454 v1(130.875,40.512)
  Bottom Layer w0.15: v1(130.875,40.512) 132.103,40.512 R85.2@132.115,40.5
VDATA7_1: D1.C11 R88.2 | length 6.4
  Top Layer 1 w0.3: D1.C11@129.256,40.014 v1@129.755,40.512
  Signal 2 w0.15: v1(129.759,40.512) 130.184,40.937 132.937,40.937 133.25,41.25 v1(135.115,41.25)
VDATA8_1: D1.C10 R61.2 | length 10.8
  Top Layer 1 w0.3: D1.C10@128.256,40.014 128.259,40.014 128.756,40.512 v1(128.759,40.512)
  Signal 2 w0.15: v1(128.759,40.512) 129.184,40.937 129.184,41.809 129.5,42.125 130,42.125 130.375,42.5 130.375,42.75 130.875,43.25 131.25,43.25 134.463,46.463 v1(135.713,46.463)
VDATA9_1: D1.D12 R66.2 | length 2.3
  Top Layer 1 w0.3: D1.D12@130.275,39.033 130.701,39.459 130.818,39.459 v1(130.875,39.517)
  Bottom Layer w0.15: v1(130.875,39.517) 131.392,39 R66.2@132.115,39
VDATA10_1: D1.D11 R71.2 | length 6.6
  Top Layer 1 w0.3: D1.D11@129.256,39.014 v1(129.761,39.517)
  Signal 2 w0.15: v1(129.761,39.517) 130.277,39 131.875,39 132.625,39.75 v1(135.115,39.75)
VDATA11_1: D1.D10 R76.2 | length 10.9
  Top Layer 1 w0.3: D1.D10@128.256,39.014 v1(128.759,39.517)
  Signal 2 w0.15: v1(128.759,39.517) 129.293,40.05 134.3,40.05 134.625,40.375 136.865,40.375 v1(138.115,39.125)
VDD_4: R170.1 X5.+5V_VDDF X5.+5V_VDDS | length 4.9
  Top Layer 1 w0.8: R170.1@151.25,51.385 152.782,51.385 153.175,50.992 X5.+5V_VDDF@153.446,50.992
  Top Layer 1 w1: X5.+5V_VDDF@153.446,50.992 X5.+5V_VDDS@155.986,50.992
VREFN_5: C55.2 D3.39 | length 2.1
  Top Layer 1 w0.3: C55.2@29.395,53.365 29.445,53.365 29.878,52.932 D3.39@29.878,51.494
VREFP_5: C53.2 D3.38 | length 2.1
  Top Layer 1 w0.3: D3.38@30.378,51.494 30.378,52.898 30.845,53.365 C53.2@30.895,53.365
VSYNC_1: D1.E10 R63.2 | length 126.4
  Top Layer 1 w0.3: D1.E10@128.256,38.014 128.259,38.014 128.756,38.511 v1@128.759,38.511
  Signal 4 w0.15: v1(19.73,41.402) 27.057,34.075 32.723,34.075 41.023,42.375 48.229,42.375 55.854,50 98.979,50 101.091,47.888 118.737,47.888 119.21,47.415 120.21,47.415 122.875,44.75 126.375,44.75 128.25,42.875 128.25,39.023 v1(128.761,38.511)
VSYNC_5: D3.64 R63.1 | length 2.4
  Top Layer 1 w0.15: R63.1@21.25,41.402 21.25,41.452 21.792,41.994 D3.64@23.378,41.994
XTAL1_5: C51.1 D3.21 R55.2 ZQ3.2 | length 7.9
  Top Layer 1 w0.3: D3.21@34.878,43.994 35.51,43.994 cw(c35.51,42.184) 35.513,43.994 35.553,43.994 cw(c35.553,43.569) 35.589,43.992 ccw(c35.613,44.291) 35.597,43.992 cw(c35.51,42.184) 36.396,43.762 ccw(c36.542,44.025) 36.44,43.742 36.44,43.764 36.451,43.755 R55.2@36.79,43.464
  Top Layer 1 w0.5: C51.1@36.76,41.885 36.767,41.892 39.378,41.892 ZQ3.2@39.385,41.9 38.55,42.735 ccw(c36.79,40.975) R55.2@36.79,43.464
XTAL2_5: C52.1 D3.22 R55.1 ZQ3.1 | length 7.9
  Top Layer 1 w0.3: D3.22@34.878,44.494 35.607,44.494 ccw(c35.607,46.167) R55.1@36.79,44.984
  Top Layer 1 w0.5: R55.1@36.79,44.984 ccw(c36.79,47.348) 38.461,45.676 39.197,46.412 ZQ3.1@39.385,46.6 cw(c39.119,46.866) 39.119,46.49 C52.1@36.76,46.49 C52.1@36.815,46.545
Y_1: C48.1 R91.1 | length 17.3
  Top Layer 1 w0.3: R91.1@38.2,57 48.154,57 ccw(c48.154,59.54) 50.694,59.54 C48.1@50.694,62.854
Y_5: D3.35 R90.2 R92.2 R93.2 | length 5.9
  Top Layer 1 w0.3: D3.35@31.878,51.494 31.878,52.676 32.32,53.118 32.37,53.118 32.82,53.568 R90.2@32.82,53.618 33.01,53.808 R93.2@33.01,55.375 R92.2@33.01,56.875
pads on no net: D1.5 D2.1 D2.3 D2.4 D2.5 D2.7 D2.8 D2.9 D2.20 D2.28 D2.29 D2.46 D2.47 D2.54 D2.68 D2.69 D2.70 D2.84 D2.87 D2.89 D2.91 D2.95 D2.96 D3.27 D3.28 D3.33 D3.36 D3.41 D3.42 D3.44 D3.45 D3.46 D3.49 D3.50 K11.3 K11.10 SA1.3 SA1.4 SA2_BTN1.1 SA2_BTN21.1 SA2_BTN22.1 X2. X5.26 X5.27 X5.28 X5.29 X5.30 X5.31 X5.32 X5.33 X5.34 X5.35 X5.36 X5.37 X5.38 X5.39 X5.40 X5.41 X5.42 X5.43 X5.44 X5.45 X5.46 X5.47 X5.+12V X5.-12V X5.IN-OUT1 X5.IN-OUT2 X5.IN-OUT3 X5.IN-OUT4 X5.IN-OUT5 X5.IN-OUT6 X5.IN-OUT7 X5.IN-OUT8 X5.NC X5.OUT2 X5.OUT3 X5.OUT4 X5.OUT5 X5.OUT6 X5.OUT7 X5.OUT8 X5.VDDF X5.VDDS X5.VEEF X5.VEES

## Polygon pours and split planes (outlines as drawn)
+3.3V on Bottom Layer "NONET_L-01_P-001" (solid, remove dead copper, pour order 5): 146.441,7.816 146.75,8.125 149.25,8.125 149.75,7.625 149.75,4.125 148.375,2.75 130.661,2.75 123.898,9.75 53.875,9.75 46.875,2.75 20.125,2.75 19.125,3.75 19.125,6.75 19.5,7.125 21.902,7.125 21.902,5.098 22.125,4.875 27.25,4.875 27.375,5 27.375,7.011 29.5,7.011 29.5,5.125 29.75,4.875 34.75,4.875 35,5.125 35,7.011 37,7.011 37,5.125 37.25,4.875 42.5,4.875 50.375,12.75 50.375,38.875 51,39.5 53.25,39.5 54,38.75 54,16.625 56.375,14.25 129.875,14.25 131.125,13 136.75,7.375 146,7.375
+3.3V_VDD on Bottom Layer "NONET_L-01_P-001" (solid, remove dead copper, pour order 9): 50.189,31.759 50.189,30.364 49.977,30.152 40.296,30.152 40.064,30.384 40.064,31.634 40.389,31.958 49.99,31.958
DGND_1 on Bottom Layer "NONET_L-01_P-001" (solid, remove dead copper, pour order 0): 93.875,59.875 93.875,56 94.5,55.375 96,55.375 96.875,56.25 96.875,58 97.375,58.5 108.5,58.5 111.375,55.625 111.375,24.5 114.875,21 135.5,21 142,27.5 142,56.75 139.443,59.307 119.581,59.307 117.763,61.125 95.125,61.125
+5V on Bottom Layer "NONET_L-01_P-001" (solid, remove dead copper, pour order 2): 157.125,19.25 147.375,19.25 146,20.625 109,20.625 107.875,21.75 107.875,23.25 109.125,24.5 109.125,48.5 107.875,49.75 107.875,51.25 109.875,53.25 109.875,56 107.625,58.25 102.375,58.25 101.909,57.784 101.909,56.091 102.875,55.125 106.75,55.125 107.5,54.375 107.5,53.116 105.75,51.366 105.75,47.625 104.986,46.861 102.486,46.861 102.125,46.5 102.125,45.125 103,44.25 106.125,44.25 107,43.375 107,36.25 106.229,35.479 102.854,35.479 102.245,34.87 102.245,33.38 103,32.625 106.125,32.625 107,31.75 107,25.875 104.866,23.741 102.491,23.741 101.909,23.159 101.909,21.591 102.375,21.125 104.875,21.125 107.75,18.25 144.036,18.25 145.224,17.062 145.224,13.901 145.75,13.375 148.75,13.375 149.311,13.936 149.311,15.311 149.75,15.75 149.75,16.75 150.125,17.125 151.625,17.125 152.125,16.625 157.125,16.625 157.5,17 157.5,18.875
GND on Bottom Layer "NONET_L-01_P-001" (solid, remove dead copper, pour order 26): 1,82.25 1,1 158.375,1 158.375,82.25
+3.3V_VDDIO on Bottom Layer "NONET_L-01_P-001" (solid, remove dead copper, pour order 6): 50.25,38.5 50.25,36.375 41.625,36.375 40.625,37.375 40.625,39 41.125,39.5 49.25,39.5
+3.3V_VBAT on Bottom Layer "NONET_L-01_P-001" (solid, remove dead copper, pour order 8): 50.125,34.875 50.125,33.481 49.913,33.269 35.014,33.269 28.125,26.379 28.125,23 27.474,22.349 24.026,22.349 23.547,22.828 23.547,26.172 32.45,35.075 49.925,35.075
+3.3V_VDDA on Bottom Layer "NONET_L-01_P-001" (solid, remove dead copper, pour order 10): 50.189,28.509 50.189,27.114 49.977,26.902 40.296,26.902 40.064,27.134 40.064,28.189 40.583,28.708 49.99,28.708
+1.8V_VDD on Bottom Layer "NONET_L-01_P-001" (solid, remove dead copper, pour order 19): 49.758,42.771 49.758,41.377 49.545,41.165 42.21,41.165 41.75,41.625 41.75,43.5 42.181,43.931 43.944,43.931 44.904,42.971 49.558,42.971
+1.8V_VDDPLL on Bottom Layer "NONET_L-01_P-001" (solid, remove dead copper, pour order 12): 49.758,46.021 49.758,44.627 49.545,44.415 42.21,44.415 41.75,44.875 41.75,46.875 42.268,47.393 43.607,47.393 44.779,46.221 49.558,46.221
+1.8V_VADD on Bottom Layer "NONET_L-01_P-001" (solid, remove dead copper, pour order 11): 49.883,49.271 49.883,47.877 49.67,47.665 43.71,47.665 43.125,48.25 43.125,50.125 43.625,50.625 48.529,50.625
+1.8V on Bottom Layer "NONET_L-01_P-001" (solid, remove dead copper, pour order 7): 50,49.875 50,40.5 50.625,39.875 53.5,39.875 54.125,40.5 54.125,49.75 53.375,50.5 50.625,50.5
+1.8V on Bottom Layer "NONET_L-01_P-001" (solid, remove dead copper, pour order 3): 142.625,17 142.625,14.25 141.875,13.5 141,13.5 140.5,13 140.5,11.5 140.875,11.125 146.75,11.125 147.125,11.5 147.125,12.625 146.75,13 145.625,13 145,13.625 145,16.875 144.5,17.375 143,17.375
+1.5V on Signal 2 "NONET_L-01_P-001" (solid, remove dead copper, pour order 18): 149.25,58.875 149.25,56.125 149.25,39.399 131.976,22.125 122.625,22.125 121.75,23 121.75,24.375 123.672,26.297 123.672,30.681 123.162,31.192 123.162,33.787 123.479,34.104 126.169,34.104 126.349,33.924 126.349,31.316 126.566,31.099 129.026,31.099 129.349,30.776 129.349,30.026 130.25,29.125 134.365,29.125 144.375,39.135 144.375,52.625 143.25,53.75 133.375,53.75 130.125,50.5 128.76,50.5 126.5,48.24 126.5,39.252 125.762,38.514 123.763,38.514 123.162,39.116 123.162,48.953 121.615,50.5 120.75,50.5 119.375,51.875 119.375,53.75 123.091,57.466 140.079,57.466 143.113,60.5 147.625,60.5
+3.3V on Signal 2 "NONET_L-01_P-001" (solid, remove dead copper, pour order 4): 93.955,24.455 93.955,15.58 93.955,14.205 92.625,12.875 91.5,12.875 90.75,12.125 90.75,11.625 91.625,10.75 105,10.75 105.5,11.25 105.5,12 105,12.5 99.125,12.5 97.181,14.444 97.181,23.181 97.819,23.819 98.694,23.819 99.125,24.25 99.125,25.375 98.875,25.625 95.125,25.625
DGND_2 on Power "NONET_L-01_P-001" (solid, remove dead copper, pour order 27): 133.75,34.5 137.125,34.5 137.875,33.75 137.875,23.125 135.625,20.875 113.125,20.875 111.625,22.375 111.625,51.75 110.5,52.875 108.963,52.875 105.817,49.692 94.933,49.692 93.875,50.75 93.875,53.751 94.769,54.643 104.115,54.615 106.171,56.671 115.454,56.671 116.53,55.595 116.53,29.595 117.75,28.375 131.375,28.375 132.875,29.875 132.875,33.625
+1.8V on Power "NONET_L-01_P-001" (solid, remove dead copper, pour order 1): 140.625,15.125 139.375,13.875 76,13.875 70.875,19 63.427,26.448 57.927,26.448 54.858,29.517 54.858,49.017 52.841,51.034 50.534,51.034 48.625,49.125 48.625,24.125 52.125,20.625 58.125,20.625 70,8.75 136.5,8.75 137.375,7.875 145.67,7.875 147.125,9.442 147.125,15.161 145.911,16.375 141.875,16.375
+3.3V_VDD on Power "NONET_L-01_P-001" (solid, remove dead copper, pour order 30): 44.875,31.75 44.875,29.875 43.957,28.957 40.329,28.957 39.813,28.44 39.813,25.688 36.392,22.267 24.082,22.267 21.161,19.347 21.161,17.441 22.066,16.536 36.714,16.536 37.634,15.616 37.634,13.759 36.914,13.039 18.836,13.039 17.625,14.25 17.625,26.625 16.375,27.875 9.375,27.875 8.875,28.375 8.875,31 9.625,31.75 18.77,31.75 19.895,32.875 23.875,32.875 43.75,32.875
+3.3V_VDDIO on Power "NONET_L-01_P-001" (solid, remove dead copper, pour order 13): 17.875,41.5 19.125,40.25 30.375,40.25 35,35.625 45.023,35.625 46,36.602 46,38.875 44.625,40.25 36.5,40.25 32.285,44.465 27.692,44.465 27.459,44.696 27.452,45.673 27.248,45.875 26.5,45.875 26.125,45.5 26.125,44.375 25.125,43.375 21.537,43.375 20.75,44.162 20.75,49.625 20.054,50.321 18.696,50.321 17.875,49.5
+1.8V_VDD on Power "NONET_L-01_P-001" (solid, remove dead copper, pour order 33): 45,43.625 45,41 44.571,40.571 36.613,40.571 32.216,44.968 28.782,44.968 28.289,45.461 28.289,46.086 28.185,46.19 26.315,46.19 25.801,45.676 25.801,44.435 25.491,44.125 21.963,44.125 21.375,44.713 21.375,46.75 22.625,48 34.625,48 38.5,44.125 44.5,44.125
+1.8V_VDDPLL on Power "NONET_L-01_P-001" (solid, remove dead copper, pour order 14): 44.375,44.5 38.75,44.5 34.875,48.375 32.125,48.375 31.54,48.96 31.54,50.54 32,51 35.75,51 36.429,50.321 39.054,50.321 42,47.375 44.375,47.375 45.078,46.672 45.078,45.203
+3.3V_VDDA on Power "NONET_L-01_P-001" (solid, remove dead copper, pour order 29): 45,28.25 45,23.945 37.93,16.875 22.25,16.875 21.5,17.625 21.5,19.25 23.625,21.375 33.5,21.375 35.875,21.375 40.148,25.648 40.148,28.023 40.75,28.625 44.625,28.625
+3.3V on Power "NONET_L-01_P-001" (solid, remove dead copper, pour order 20): 152.125,46 152.125,43.875 151.25,43 140.875,43 132.5,34.625 132.5,30.125 131.057,28.682 118.068,28.682 116.875,29.875 116.875,44.75 119.115,46.99 151.135,46.99
+5V on Power "NONET_L-01_P-001" (solid, remove dead copper, pour order 22): 105,55.875 100.25,55.875 99.625,56.5 99.625,57.5 99,58.125 90.428,58.125 89.988,57.685 89.988,56.488 89.25,55.75 83,55.75 82.375,56.375 82.375,57.125 80.845,58.655 73.492,58.655 72.493,57.656 72.493,56.618 71.625,55.75 66.25,55.75 65.375,56.625 65.375,59.625 66.625,60.875 104.625,60.875 105.625,59.875 105.625,56.5
+5V on Power "NONET_L-01_P-001" (solid, remove dead copper, pour order 25): 105.175,21.55 99.825,21.55 99.416,21.959 99.416,23.334 98.95,23.8 89.55,23.8 89.041,23.291 89.041,22.416 88.05,21.425 83.2,21.425 82.541,22.084 82.541,25.416 84.875,27.75 103.375,27.75 105.791,25.334 105.791,22.166
+5V on Power "NONET_L-01_P-001" (solid, remove dead copper, pour order 24): 105.25,31.875 100.75,31.875 100.25,32.375 100.25,34.375 99.45,35.175 91.425,35.175 90.75,34.5 90.75,32.375 90,31.625 83.5,31.625 82.75,32.375 82.75,34.5 82.117,35.133 73.883,35.133 73,34.25 73,32.25 72.375,31.625 66.25,31.625 65.625,32.25 65.625,37.375 67.5,39.25 104,39.25 105.791,37.459 105.791,32.416
+5V on Power "NONET_L-01_P-001" (solid, remove dead copper, pour order 23): 105.125,43.375 100.375,43.375 99.625,44.125 99.625,46.375 99.25,46.75 90.679,46.75 90.23,46.301 90.23,43.73 89.875,43.375 82.75,43.375 82.125,44 82.125,46.125 81.5,46.75 73.054,46.75 72.433,46.129 72.433,43.808 72,43.375 66.125,43.375 65.375,44.125 65.375,48.375 67.5,50.5 93.25,50.5 94.401,49.349 104.776,49.349 105.75,48.375 105.75,44